# Altium PCB ledcube_v2.PcbDoc (part 9 of 18)
Units mil, origin at the board's own origin, x right, y up, seen from the top; angles counter-clockwise.
Board outline 3130 x 3300 mil, 2 copper layers (Top Layer, Bottom Layer); 188 components, 216 nets, 29515 pads, 250 vias.
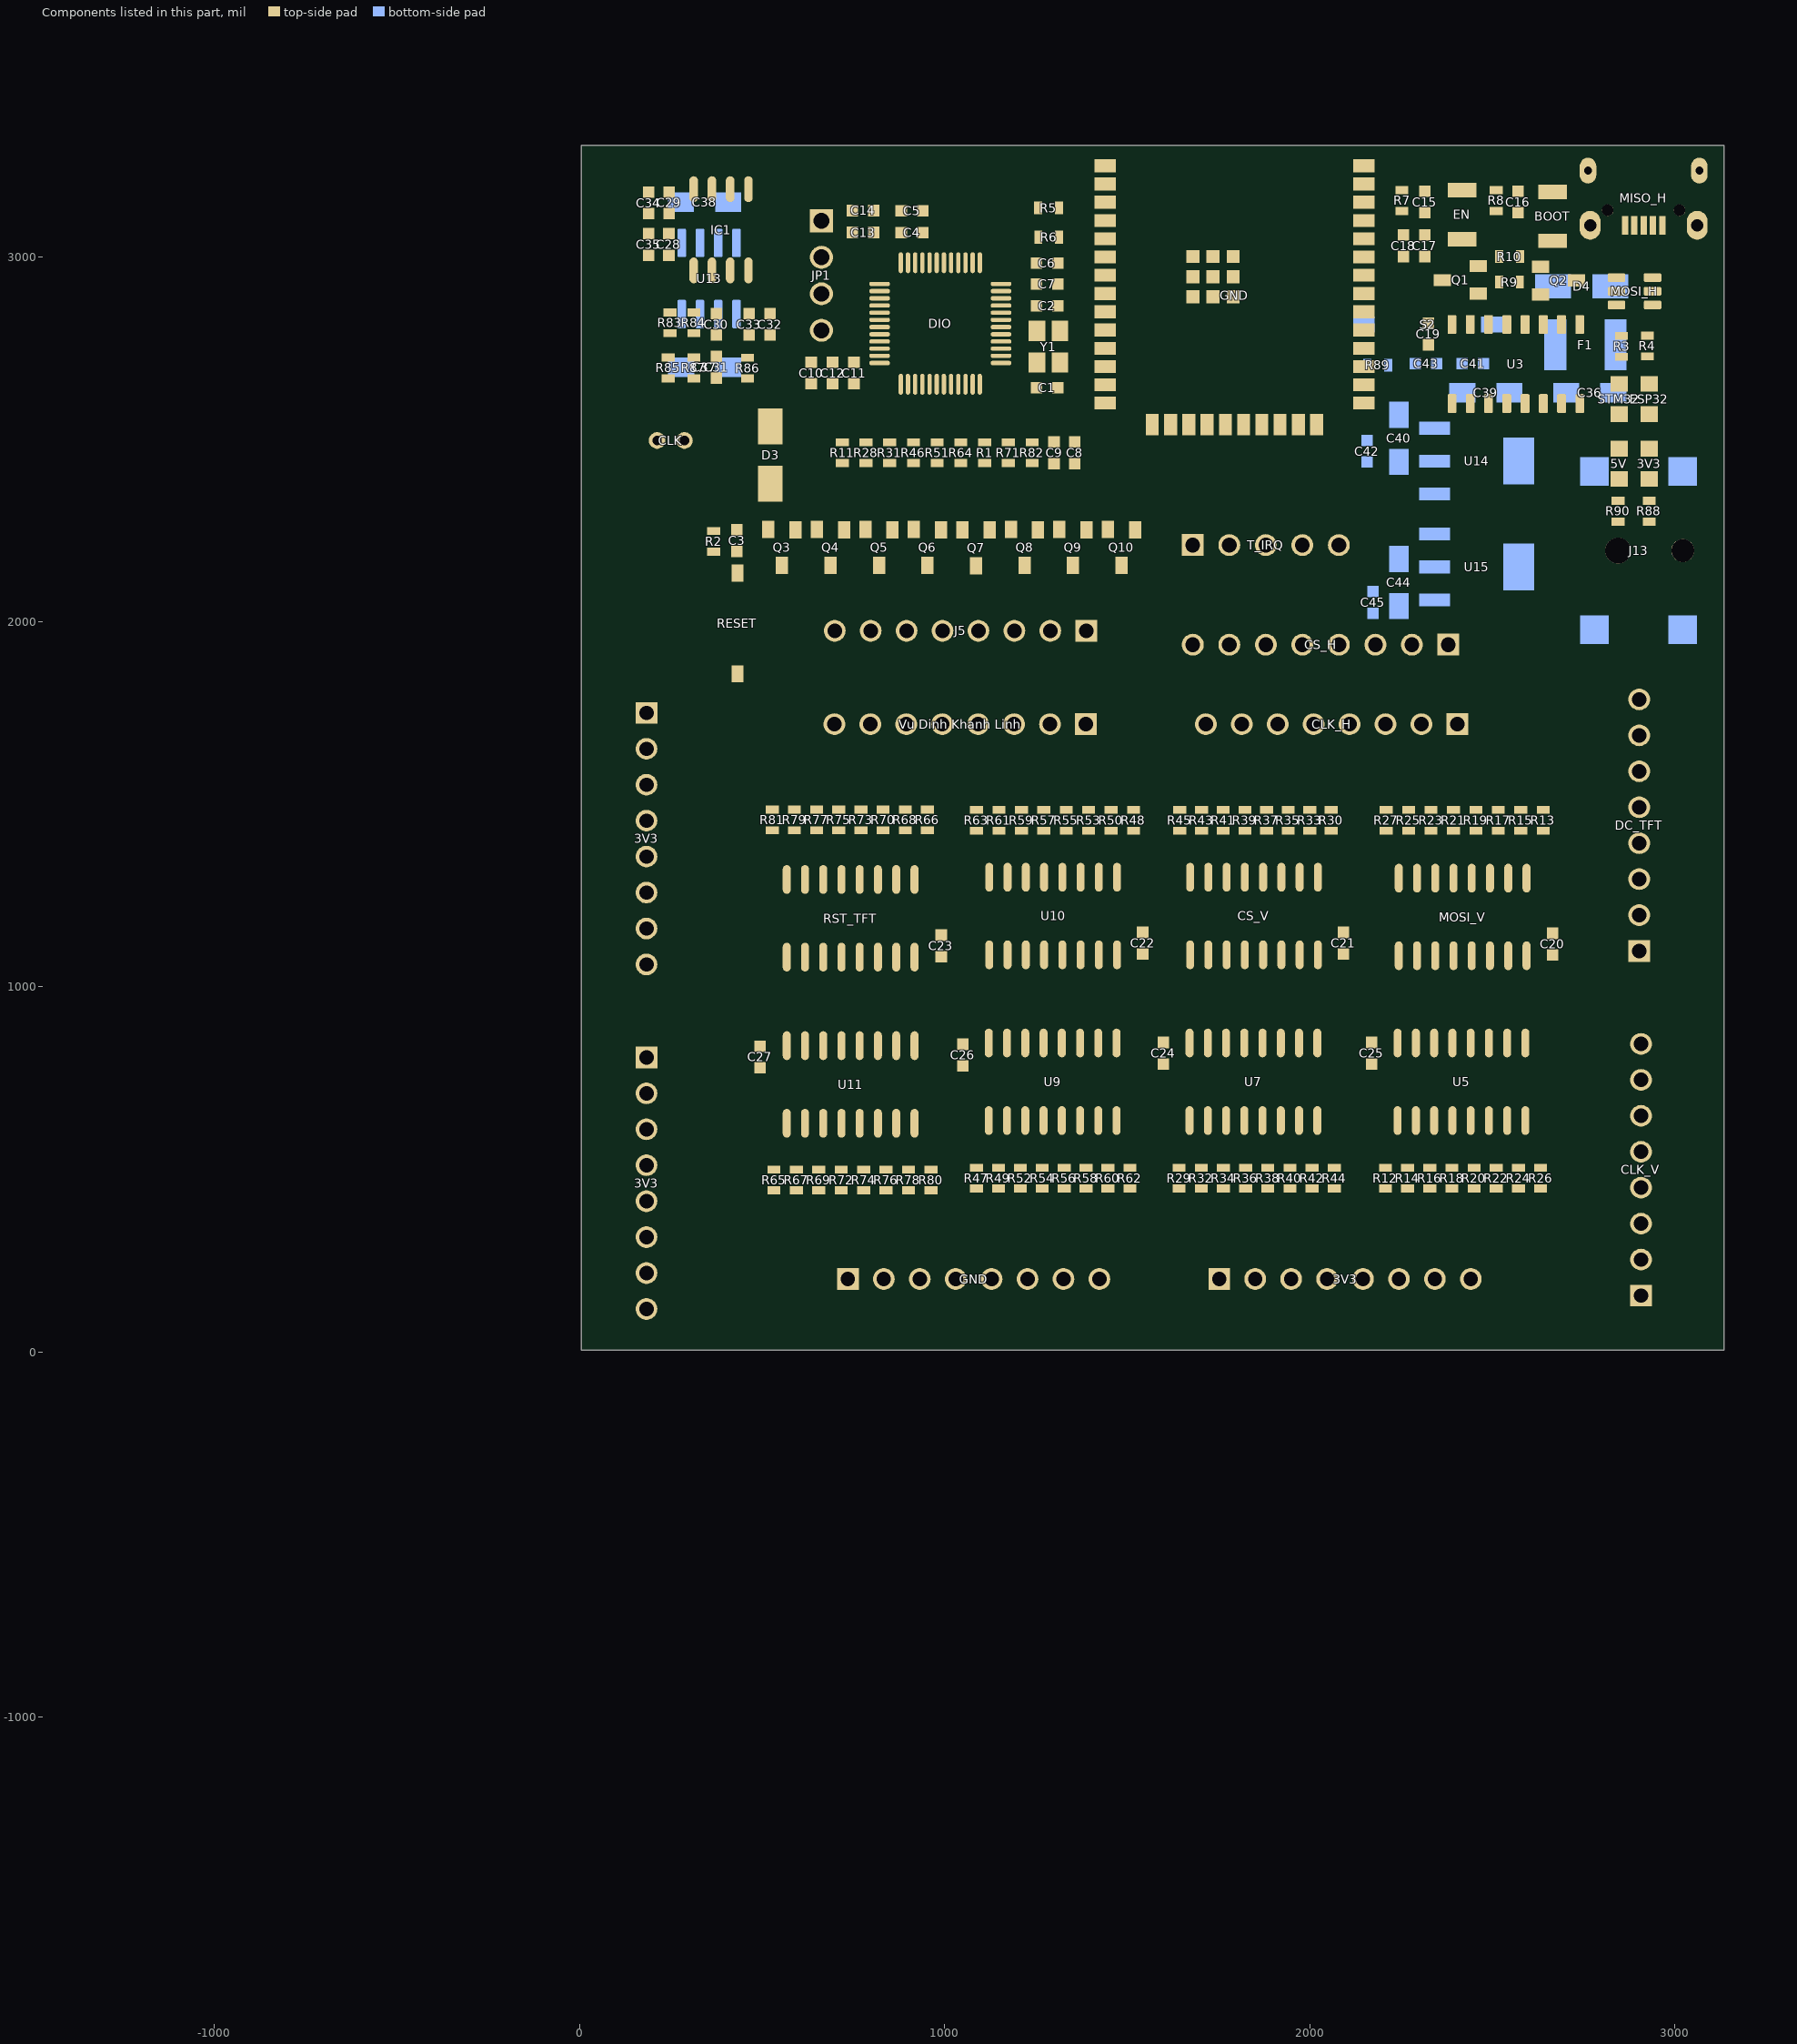
[diagram p8: the components of this part, seen from the top]

## Free pads (board coordinates) (continued)
  round 0 on Mech16: 1(-1372.43,-1737) 1(-1372.43,-1736.94) 1(-1372.43,-1736.94) 1(-1372.43,-1737.21) 1(-1372.43,-1737.21) 1(-1372.43,-1737) 1(-1372.43,-1737) 1(-1372.42,-1737.07) 1(-1372.42,-1737.07) 1(-1372.42,-1737.06) 1(-1372.42,-1737.06) 1(-1372.42,-1737.03) 1(-1372.42,-1737.03) 1(-1372.42,-1737.26) 1(-1372.42,-1737.26) 1(-1372.42,-1737.08) 1(-1372.42,-1737.08) 1(-1372.42,-1737.03) 1(-1372.42,-1737.03) 1(-1372.42,-1737.07) 1(-1372.42,-1737.07) 1(-1372.42,-1737.02) 1(-1372.42,-1737.02) 1(-1372.42,-1737.22) 1(-1372.42,-1737.22) 1(-1372.42,-1737.05) 1(-1372.42,-1737.05) 1(-1372.42,-1737.04) 1(-1372.42,-1737.04) 1(-1372.42,-1737.08) 1(-1372.42,-1737.08) 1(-1372.42,-1737.22) 1(-1372.42,-1737.22) 1(-1372.42,-1737) 1(-1372.42,-1737) 1(-1372.42,-1737.05) 1(-1372.42,-1737.05) 1(-1372.42,-1737.26) 1(-1372.42,-1737.26) 1(-1372.42,-1737.09) 1(-1372.42,-1737.09) 1(-1372.42,-1737.09) 1(-1372.42,-1737.09) 1(-1372.42,-1737.05) 1(-1372.42,-1737.05) 1(-1372.42,-1737.04) 1(-1372.42,-1737.04) 1(-1372.42,-1737.22) 1(-1372.42,-1737.22) 1(-1372.42,-1737.09) 1(-1372.42,-1737.09) 1(-1372.42,-1737.07) 1(-1372.42,-1737.07) 1(-1372.42,-1737.03) 1(-1372.42,-1737.03) 1(-1372.42,-1737.31) 1(-1372.42,-1737.31) 1(-1372.42,-1737.02) 1(-1372.42,-1737.02) 1(-1372.42,-1737) 1(-1372.42,-1737) 1(-1372.42,-1737.04) 1(-1372.42,-1737.04) 1(-1372.42,-1737.02) 1(-1372.42,-1737.02) 1(-1372.42,-1736.99) 1(-1372.42,-1736.99) 1(-1372.42,-1737.07) 1(-1372.42,-1737.07) 1(-1372.42,-1737.21) 1(-1372.42,-1737.21) 1(-1372.42,-1737.01) 1(-1372.42,-1737.01) 1(-1372.42,-1737.07) 1(-1372.42,-1737.07) 1(-1372.42,-1737) 1(-1372.42,-1737) 1(-1372.42,-1737.22) 1(-1372.42,-1737.22) 1(-1372.42,-1737.02) 1(-1372.42,-1737.02) 1(-1372.42,-1737.31) 1(-1372.42,-1737.31) 1(-1372.42,-1737.09) 1(-1372.42,-1737.09) 1(-1372.42,-1737) 1(-1372.42,-1737) 1(-1372.42,-1736.99) 1(-1372.42,-1736.99) 1(-1372.42,-1737.02) 1(-1372.42,-1737.02) 1(-1372.42,-1737) 1(-1372.42,-1737) 1(-1372.42,-1737.05) 1(-1372.42,-1737.05) 1(-1372.42,-1737.05) 1(-1372.42,-1737.05) 1(-1372.42,-1737.09) 1(-1372.42,-1737.09) 1(-1372.42,-1737.05) 1(-1372.42,-1737.05) 1(-1372.42,-1737.03) 1(-1372.42,-1737.03) 1(-1372.41,-1736.99) 1(-1372.41,-1736.99) 1(-1372.41,-1737.22) 1(-1372.41,-1737.22) 1(-1372.41,-1736.97) 1(-1372.41,-1736.97) 1(-1372.41,-1736.95) 1(-1372.41,-1736.95) 1(-1372.41,-1737.06) 1(-1372.41,-1737.06) 1(-1372.41,-1737.06) 1(-1372.41,-1737.06) 1(-1372.41,-1736.95) 1(-1372.41,-1736.95) 1(-1372.41,-1737.22) 1(-1372.41,-1737.22) 1(-1372.41,-1737.21) 1(-1372.41,-1737.21) 1(-1372.41,-1736.94) 1(-1372.41,-1736.94) 1(-1372.41,-1737.09) 1(-1372.41,-1737.09) 1(-1372.41,-1737.06) 1(-1372.41,-1737.06) 1(-1372.41,-1737.06) 1(-1372.41,-1737.06) 1(-1372.41,-1736.93) 1(-1372.41,-1736.93) 1(-1372.41,-1736.9) 1(-1372.41,-1736.9) 1(-1372.41,-1737.22) 1(-1372.41,-1737.22) 1(-1372.41,-1736.9) 1(-1372.41,-1736.9) 1(-1372.41,-1737.22) 1(-1372.41,-1737.22) 1(-1372.41,-1737) 1(-1372.41,-1737) 1(-1372.41,-1736.97) 1(-1372.41,-1736.97) 1(-1372.41,-1736.91) 1(-1372.41,-1736.91) 1(-1372.41,-1737.03) 1(-1372.41,-1737.03) 1(-1372.41,-1737.26) 1(-1372.41,-1737.26) 1(-1372.41,-1737.21) 1(-1372.41,-1737.21) 1(-1372.41,-1737.22) 1(-1372.41,-1737.22) 1(-1372.41,-1737.05) 1(-1372.41,-1737.05) 1(-1372.41,-1736.94) 1(-1372.41,-1736.94) 1(-1372.41,-1737.05) 1(-1372.41,-1737.05) 1(-1372.41,-1736.93) 1(-1372.41,-1736.93) 1(-1372.41,-1737.05) 1(-1372.41,-1737.05) 1(-1372.41,-1736.95) 1(-1372.41,-1736.95) 1(-1372.41,-1737.09) 1(-1372.41,-1737.09) 1(-1372.41,-1736.94) 1(-1372.41,-1736.94) 1(-1372.41,-1736.94) 1(-1372.41,-1736.94) 1(-1372.41,-1736.91) 1(-1372.41,-1736.91) 1(-1372.41,-1736.89) 1(-1372.41,-1736.89) 1(-1372.41,-1737.05) 1(-1372.41,-1737.05) 1(-1372.41,-1737.06) 1(-1372.41,-1737.06) 1(-1372.41,-1736.95) 1(-1372.41,-1736.95) 1(-1372.41,-1737.09) 1(-1372.41,-1737.09) 1(-1372.41,-1737.04) 1(-1372.41,-1737.04) 1(-1372.41,-1737.21) 1(-1372.41,-1737.21) 1(-1372.41,-1737.05) 1(-1372.41,-1737.05) 1(-1372.41,-1737.04) 1(-1372.41,-1737.04) 1(-1372.41,-1736.95) 1(-1372.41,-1736.95) 1(-1372.41,-1736.93) 1(-1372.41,-1736.93) 1(-1372.41,-1737.21) 1(-1372.41,-1737.21) 1(-1372.41,-1737.09) 1(-1372.41,-1737.09) 1(-1372.41,-1736.95) 1(-1372.41,-1736.95) 1(-1372.41,-1737.22) 1(-1372.41,-1737.22) 1(-1372.41,-1737.04) 1(-1372.41,-1737.04) 1(-1372.41,-1736.93) 1(-1372.41,-1736.93) 1(-1372.41,-1737.06) 1(-1372.41,-1737.06) 1(-1372.41,-1737.22) 1(-1372.41,-1737.22) 1(-1372.41,-1737.21) 1(-1372.41,-1737.21) 1(-1372.41,-1737.05) 1(-1372.41,-1737.05) 1(-1372.41,-1736.94) 1(-1372.41,-1736.94) 1(-1372.41,-1736.94) 1(-1372.41,-1736.94) 1(-1372.41,-1736.9) 1(-1372.41,-1736.9) 1(-1372.41,-1737.06) 1(-1372.41,-1737.06) 1(-1372.41,-1736.91) 1(-1372.41,-1736.91) 1(-1372.4,-1737.09) 1(-1372.4,-1737.09) 1(-1372.4,-1737.04) 1(-1372.4,-1737.04) 1(-1372.4,-1736.94) 1(-1372.4,-1736.94) 1(-1372.4,-1737.04) 1(-1372.4,-1737.04) 1(-1372.4,-1737.09) 1(-1372.4,-1737.09) 1(-1372.4,-1737.04) 1(-1372.4,-1737.04) 1(-1372.4,-1736.94) 1(-1372.4,-1736.94) 1(-1372.4,-1737.21) 1(-1372.4,-1737.21) 1(-1372.4,-1737.1) 1(-1372.4,-1737.1) 1(-1372.4,-1737.11) 1(-1372.4,-1737.11) 1(-1372.4,-1737.1) 1(-1372.4,-1737.1) 1(-1372.4,-1736.94) 1(-1372.4,-1736.94) 1(-1372.4,-1736.94) 1(-1372.4,-1736.94) 1(-1372.4,-1737.04) 1(-1372.4,-1737.04) 1(-1372.4,-1737.04) 1(-1372.4,-1737.04) 1(-1372.4,-1737.09) 1(-1372.4,-1737.09) 1(-1372.4,-1736.89) 1(-1372.4,-1736.89) 1(-1372.4,-1736.94) 1(-1372.4,-1736.94) 1(-1372.4,-1737.1) 1(-1372.4,-1737.1) 1(-1372.4,-1737.1) 1(-1372.4,-1737.1) 1(-1372.4,-1737.2) 1(-1372.4,-1737.2) 1(-1372.4,-1737.11) 1(-1372.4,-1737.11) 1(-1372.4,-1737.04) 1(-1372.4,-1737.04) 1(-1372.4,-1737.23) 1(-1372.4,-1737.23) 1(-1372.4,-1737.04) 1(-1372.4,-1737.04) 1(-1372.4,-1737.11) 1(-1372.4,-1737.11) 1(-1372.4,-1737.23) 1(-1372.4,-1737.23) 1(-1372.4,-1737.04) 1(-1372.4,-1737.04) 1(-1372.4,-1736.91) 1(-1372.4,-1736.91) 1(-1372.4,-1737.26) 1(-1372.4,-1737.26) 1(-1372.4,-1736.9) 1(-1372.4,-1736.9) 1(-1372.4,-1737.2) 1(-1372.4,-1737.2) 1(-1372.4,-1737.03) 1(-1372.4,-1737.03) 1(-1372.4,-1737.11) 1(-1372.4,-1737.11) 1(-1372.4,-1737.03) 1(-1372.4,-1737.03) 1(-1372.4,-1737.21) 1(-1372.4,-1737.21) 1(-1372.4,-1736.94) 1(-1372.4,-1736.94) 1(-1372.39,-1737.11) 1(-1372.39,-1737.11) 1(-1372.39,-1736.89) 1(-1372.39,-1736.89) 1(-1372.39,-1737.23) 1(-1372.39,-1737.23) 1(-1372.39,-1737.2) 1(-1372.39,-1737.2) 1(-1372.39,-1737.03) 1(-1372.39,-1737.03) 1(-1372.39,-1737.23) 1(-1372.39,-1737.23) 1(-1372.39,-1737.1) 1(-1372.39,-1737.1) 1(-1372.39,-1737.03) 1(-1372.39,-1737.03) 1(-1372.39,-1737.26) 1(-1372.39,-1737.26) 1(-1372.39,-1737.2) 1(-1372.39,-1737.2) 1(-1372.39,-1736.88) 1(-1372.39,-1736.88) 1(-1372.39,-1736.94) 1(-1372.39,-1736.94) 1(-1372.39,-1737.2) 1(-1372.39,-1737.2) 1(-1372.39,-1737.23) 1(-1372.39,-1737.23) 1(-1372.39,-1736.88) 1(-1372.39,-1736.88) 1(-1372.39,-1737.17) 1(-1372.39,-1737.17) 1(-1372.39,-1737.23) 1(-1372.39,-1737.23) 1(-1372.39,-1737.19) 1(-1372.39,-1737.19) 1(-1372.39,-1737.26) 1(-1372.39,-1737.26) 1(-1372.39,-1736.9) 1(-1372.39,-1736.9) 1(-1372.39,-1737.18) 1(-1372.39,-1737.18) 1(-1372.39,-1737.11) 1(-1372.39,-1737.11) 1(-1372.39,-1737.03) 1(-1372.39,-1737.03) 1(-1372.39,-1737.23) 1(-1372.39,-1737.23) 1(-1372.39,-1737.2) 1(-1372.39,-1737.2) 1(-1372.39,-1737.31) 1(-1372.39,-1737.31) 1(-1372.39,-1736.88) 1(-1372.39,-1736.88) 1(-1372.39,-1737.26) 1(-1372.39,-1737.26) 1(-1372.39,-1737.1) 1(-1372.39,-1737.1) 1(-1372.39,-1736.89) 1(-1372.39,-1736.89) 1(-1372.39,-1737.03) 1(-1372.39,-1737.03) 1(-1372.39,-1736.88) 1(-1372.39,-1736.88) 1(-1372.38,-1737.18) 1(-1372.38,-1737.18) 1(-1372.38,-1736.88) 1(-1372.38,-1736.88) 1(-1372.38,-1736.88) 1(-1372.38,-1736.88) 1(-1372.38,-1737.04) 1(-1372.38,-1737.04) 1(-1372.38,-1736.89) 1(-1372.38,-1736.89) 1(-1372.38,-1737.19) 1(-1372.38,-1737.19) 1(-1372.38,-1737.18) 1(-1372.38,-1737.18) 1(-1372.38,-1737.18) 1(-1372.38,-1737.18) 1(-1372.38,-1736.9) 1(-1372.38,-1736.9) 1(-1372.38,-1736.89) 1(-1372.38,-1736.89) 1(-1372.38,-1737.24) 1(-1372.38,-1737.24) 1(-1372.38,-1736.88) 1(-1372.38,-1736.88) 1(-1372.38,-1737.26) 1(-1372.38,-1737.26) 1(-1372.38,-1737.18) 1(-1372.38,-1737.18) 1(-1372.38,-1737.04) 1(-1372.38,-1737.04) 1(-1372.38,-1736.88) 1(-1372.38,-1736.88) 1(-1372.38,-1736.88) 1(-1372.38,-1736.88) 1(-1372.38,-1737.24) 1(-1372.38,-1737.24) 1(-1372.38,-1737.17) 1(-1372.38,-1737.17) 1(-1372.38,-1737.03) 1(-1372.38,-1737.03) 1(-1372.38,-1736.94) 1(-1372.38,-1736.94) 1(-1372.38,-1737.22) 1(-1372.38,-1737.22) 1(-1372.38,-1737.03) 1(-1372.38,-1737.03) 1(-1372.38,-1737.1) 1(-1372.38,-1737.1) 1(-1372.38,-1736.89) 1(-1372.38,-1736.89) 1(-1372.38,-1737.03) 1(-1372.38,-1737.03) 1(-1372.38,-1736.88) 1(-1372.38,-1736.88) 1(-1372.38,-1736.9) 1(-1372.38,-1736.9) 1(-1372.38,-1737.04) 1(-1372.38,-1737.04) 1(-1372.38,-1737.03) 1(-1372.38,-1737.03) 1(-1372.38,-1736.89) 1(-1372.38,-1736.89) 1(-1372.38,-1737.02) 1(-1372.38,-1737.02) 1(-1372.38,-1737.18) 1(-1372.38,-1737.18) 1(-1372.38,-1736.94) 1(-1372.38,-1736.94) 1(-1372.38,-1736.93) 1(-1372.38,-1736.93) 1(-1372.38,-1736.92) 1(-1372.38,-1736.92) 1(-1372.38,-1736.99) 1(-1372.38,-1736.99) 1(-1372.38,-1736.99) 1(-1372.38,-1736.99) 1(-1372.38,-1736.92) 1(-1372.38,-1736.92) 1(-1372.38,-1737.01) 1(-1372.38,-1737.01) 1(-1372.38,-1736.99) 1(-1372.38,-1736.99) 1(-1372.38,-1736.96) 1(-1372.38,-1736.96) 1(-1372.38,-1737.29) 1(-1372.38,-1737.29) 1(-1372.38,-1736.98) 1(-1372.38,-1736.98) 1(-1372.38,-1736.89) 1(-1372.38,-1736.89) 1(-1372.38,-1737.04) 1(-1372.38,-1737.04) 1(-1372.38,-1736.99) 1(-1372.38,-1736.99) 1(-1372.38,-1736.95) 1(-1372.38,-1736.95) 1(-1372.38,-1737) 1(-1372.38,-1737) 1(-1372.38,-1736.94) 1(-1372.38,-1736.94) 1(-1372.38,-1736.92) 1(-1372.38,-1736.92) 1(-1372.38,-1737.01) 1(-1372.38,-1737.01) 1(-1372.38,-1736.99) 1(-1372.38,-1736.99) 1(-1372.38,-1737.26) 1(-1372.38,-1737.26) 1(-1372.38,-1736.98) 1(-1372.38,-1736.98) 1(-1372.38,-1736.96) 1(-1372.38,-1736.96) 1(-1372.38,-1737.11) 1(-1372.38,-1737.11) 1(-1372.38,-1737.02) 1(-1372.38,-1737.02) 1(-1372.38,-1737.02) 1(-1372.38,-1737.02) 1(-1372.38,-1737.02) 1(-1372.38,-1737.02) 1(-1372.38,-1736.99) 1(-1372.38,-1736.99) 1(-1372.38,-1737.11) 1(-1372.38,-1737.11) 1(-1372.38,-1737.04) 1(-1372.38,-1737.04) 1(-1372.38,-1737.03) 1(-1372.38,-1737.03) 1(-1372.38,-1737.03) 1(-1372.38,-1737.03) 1(-1372.38,-1736.95) 1(-1372.38,-1736.95) 1(-1372.38,-1736.92) 1(-1372.38,-1736.92) 1(-1372.38,-1736.98) 1(-1372.38,-1736.98) 1(-1372.38,-1736.94) 1(-1372.38,-1736.94) 1(-1372.38,-1737.04) 1(-1372.38,-1737.04) 1(-1372.38,-1737.03) 1(-1372.38,-1737.03) 1(-1372.38,-1736.95) 1(-1372.38,-1736.95) 1(-1372.38,-1736.97) 1(-1372.38,-1736.97) 1(-1372.38,-1736.89) 1(-1372.38,-1736.89) 1(-1372.38,-1736.96) 1(-1372.38,-1736.96) 1(-1372.38,-1737.17) 1(-1372.38,-1737.17) 1(-1372.38,-1736.99) 1(-1372.38,-1736.99) 1(-1372.38,-1737.04) 1(-1372.38,-1737.04) 1(-1372.38,-1737.02) 1(-1372.38,-1737.02) 1(-1372.38,-1736.96) 1(-1372.38,-1736.96) 1(-1372.38,-1737.11) 1(-1372.38,-1737.11) 1(-1372.38,-1736.99) 1(-1372.38,-1736.99) 1(-1372.38,-1736.96) 1(-1372.38,-1736.96) 1(-1372.38,-1737.02) 1(-1372.38,-1737.02) 1(-1372.38,-1736.99) 1(-1372.38,-1736.99) 1(-1372.38,-1736.88) 1(-1372.38,-1736.88) 1(-1372.37,-1737.03) 1(-1372.37,-1737.03) 1(-1372.37,-1737.02) 1(-1372.37,-1737.02) 1(-1372.37,-1737.11) 1(-1372.37,-1737.11) 1(-1372.37,-1737.04) 1(-1372.37,-1737.04) 1(-1372.37,-1736.89) 1(-1372.37,-1736.89) 1(-1372.37,-1737.12) 1(-1372.37,-1737.12) 1(-1372.37,-1736.94) 1(-1372.37,-1736.94) 1(-1372.37,-1737.17) 1(-1372.37,-1737.17) 1(-1372.37,-1736.96) 1(-1372.37,-1736.96) 1(-1372.37,-1736.98) 1(-1372.37,-1736.98) 1(-1372.37,-1736.92) 1(-1372.37,-1736.92) 1(-1372.37,-1736.89) 1(-1372.37,-1736.89) 1(-1372.37,-1736.95) 1(-1372.37,-1736.95) 1(-1372.37,-1737.11) 1(-1372.37,-1737.11) 1(-1372.37,-1737.13) 1(-1372.37,-1737.13) 1(-1372.37,-1736.92) 1(-1372.37,-1736.92) 1(-1372.37,-1737.04) 1(-1372.37,-1737.04) 1(-1372.37,-1736.98) 1(-1372.37,-1736.98) 1(-1372.37,-1737.24) 1(-1372.37,-1737.24) 1(-1372.37,-1736.98) 1(-1372.37,-1736.98) 1(-1372.37,-1736.89) 1(-1372.37,-1736.89) 1(-1372.37,-1736.94) 1(-1372.37,-1736.94) 1(-1372.37,-1736.93) 1(-1372.37,-1736.93) 1(-1372.37,-1736.92) 1(-1372.37,-1736.92) 1(-1372.37,-1737.03) 1(-1372.37,-1737.03) 1(-1372.37,-1736.95) 1(-1372.37,-1736.95) 1(-1372.37,-1737.22) 1(-1372.37,-1737.22) 1(-1372.37,-1736.95) 1(-1372.37,-1736.95) 1(-1372.37,-1737.26) 1(-1372.37,-1737.26) 1(-1372.37,-1737.06) 1(-1372.37,-1737.06) 1(-1372.37,-1736.88) 1(-1372.37,-1736.88) 1(-1372.37,-1737.03) 1(-1372.37,-1737.03) 1(-1372.37,-1737.13) 1(-1372.37,-1737.13) 1(-1372.37,-1736.93) 1(-1372.37,-1736.93) 1(-1372.37,-1736.92) 1(-1372.37,-1736.92) 1(-1372.37,-1737.04) 1(-1372.37,-1737.04) 1(-1372.37,-1736.98) 1(-1372.37,-1736.98) 1(-1372.37,-1736.94) 1(-1372.37,-1736.94) 1(-1372.37,-1737.22) 1(-1372.37,-1737.22) 1(-1372.37,-1737.24) 1(-1372.37,-1737.24) 1(-1372.37,-1736.93) 1(-1372.37,-1736.93) 1(-1372.37,-1736.92) 1(-1372.37,-1736.92) 1(-1372.37,-1736.89) 1(-1372.37,-1736.89) 1(-1372.37,-1736.88) 1(-1372.37,-1736.88) 1(-1372.37,-1737.24) 1(-1372.37,-1737.24) 1(-1372.37,-1737.11) 1(-1372.37,-1737.11) 1(-1372.37,-1736.99) 1(-1372.37,-1736.99) 1(-1372.37,-1736.93) 1(-1372.37,-1736.93) 1(-1372.37,-1736.92) 1(-1372.37,-1736.92) 1(-1372.37,-1737.23) 1(-1372.37,-1737.23) 1(-1372.37,-1736.87) 1(-1372.37,-1736.87) 1(-1372.37,-1737.17) 1(-1372.37,-1737.17) 1(-1372.37,-1737.26) 1(-1372.37,-1737.26) 1(-1372.37,-1737.22) 1(-1372.37,-1737.22) 1(-1372.37,-1737.12) 1(-1372.37,-1737.12) 1(-1372.37,-1737.12) 1(-1372.37,-1737.12) 1(-1372.37,-1736.93) 1(-1372.37,-1736.93) 1(-1372.37,-1736.92) 1(-1372.37,-1736.92) 1(-1372.37,-1737.13) 1(-1372.37,-1737.13) 1(-1372.37,-1737.11) 1(-1372.37,-1737.11) 1(-1372.37,-1736.89) 1(-1372.37,-1736.89) 1(-1372.37,-1737.23) 1(-1372.37,-1737.23) 1(-1372.37,-1737.02) 1(-1372.37,-1737.02) 1(-1372.37,-1737.23) 1(-1372.37,-1737.23) 1(-1372.37,-1736.95) 1(-1372.37,-1736.95) 1(-1372.37,-1737.05) 1(-1372.37,-1737.05) 1(-1372.37,-1736.95) 1(-1372.37,-1736.95) 1(-1372.37,-1736.92) 1(-1372.37,-1736.92) 1(-1372.37,-1736.89) 1(-1372.37,-1736.89) 1(-1372.37,-1736.96) 1(-1372.37,-1736.96) 1(-1372.37,-1737.17) 1(-1372.37,-1737.17) 1(-1372.37,-1737.04) 1(-1372.37,-1737.04) 1(-1372.37,-1737.04) 1(-1372.37,-1737.04) 1(-1372.37,-1737.04) 1(-1372.37,-1737.04) 1(-1372.37,-1736.98) 1(-1372.37,-1736.98) 1(-1372.37,-1736.94) 1(-1372.37,-1736.94) 1(-1372.37,-1736.93) 1(-1372.37,-1736.93) 1(-1372.37,-1737.15) 1(-1372.37,-1737.15) 1(-1372.37,-1737.14) 1(-1372.37,-1737.14) 1(-1372.37,-1737.05) 1(-1372.37,-1737.05) 1(-1372.37,-1736.95) 1(-1372.37,-1736.95) 1(-1372.37,-1736.92) 1(-1372.37,-1736.92) 1(-1372.37,-1736.87) 1(-1372.37,-1736.87) 1(-1372.37,-1737.03) 1(-1372.37,-1737.03) 1(-1372.37,-1737.02) 1(-1372.37,-1737.02) 1(-1372.37,-1737.23) 1(-1372.37,-1737.23) 1(-1372.37,-1737.13) 1(-1372.37,-1737.13) 1(-1372.37,-1736.94) 1(-1372.37,-1736.94) 1(-1372.37,-1737.26) 1(-1372.37,-1737.26) 1(-1372.37,-1737.04) 1(-1372.37,-1737.04) 1(-1372.37,-1737.01) 1(-1372.37,-1737.01) 1(-1372.37,-1737) 1(-1372.37,-1737) 1(-1372.37,-1736.92) 1(-1372.37,-1736.92) 1(-1372.37,-1736.89) 1(-1372.37,-1736.89) 1(-1372.37,-1737) 1(-1372.37,-1737) 1(-1372.37,-1736.95) 1(-1372.37,-1736.95) 1(-1372.37,-1737) 1(-1372.37,-1737) 1(-1372.37,-1737.01) 1(-1372.37,-1737.01) 1(-1372.37,-1736.89) 1(-1372.37,-1736.89) 1(-1372.37,-1737.16) 1(-1372.37,-1737.16) 1(-1372.37,-1737.15) 1(-1372.37,-1737.15) 1(-1372.37,-1737.06) 1(-1372.37,-1737.06) 1(-1372.37,-1737.15) 1(-1372.37,-1737.15) 1(-1372.37,-1737.14) 1(-1372.37,-1737.14) 1(-1372.37,-1737.13) 1(-1372.37,-1737.13) 1(-1372.37,-1737.13) 1(-1372.37,-1737.13) 1(-1372.37,-1737.03) 1(-1372.37,-1737.03) 1(-1372.37,-1736.98) 1(-1372.37,-1736.98) 1(-1372.37,-1736.88) 1(-1372.37,-1736.88) 1(-1372.37,-1737.04) 1(-1372.37,-1737.04) 1(-1372.37,-1737.14) 1(-1372.37,-1737.14) 1(-1372.37,-1736.96) 1(-1372.37,-1736.96) 1(-1372.37,-1737.05) 1(-1372.37,-1737.05) 1(-1372.37,-1737.05) 1(-1372.37,-1737.05) 1(-1372.37,-1737) 1(-1372.37,-1737) 1(-1372.37,-1737.16) 1(-1372.37,-1737.16) 1(-1372.37,-1737.13) 1(-1372.37,-1737.13) 1(-1372.37,-1736.97) 1(-1372.37,-1736.97) 1(-1372.37,-1736.96) 1(-1372.37,-1736.96) 1(-1372.37,-1736.89) 1(-1372.37,-1736.89) 1(-1372.37,-1736.88) 1(-1372.37,-1736.88) 1(-1372.37,-1736.99) 1(-1372.37,-1736.99) 1(-1372.37,-1737.05) 1(-1372.37,-1737.05) 1(-1372.37,-1736.87) 1(-1372.37,-1736.87) 1(-1372.37,-1737.17) 1(-1372.37,-1737.17) 1(-1372.37,-1737.05) 1(-1372.37,-1737.05) 1(-1372.37,-1736.93) 1(-1372.37,-1736.93) 1(-1372.37,-1736.98) 1(-1372.37,-1736.98) 1(-1372.37,-1736.97) 1(-1372.37,-1736.97) 1(-1372.37,-1737.01) 1(-1372.37,-1737.01) 1(-1372.37,-1736.97) 1(-1372.37,-1736.97) 1(-1372.37,-1736.95) 1(-1372.37,-1736.95) 1(-1372.37,-1736.88) 1(-1372.37,-1736.88) 1(-1372.37,-1737.15) 1(-1372.37,-1737.15) 1(-1372.37,-1737.14) 1(-1372.37,-1737.14) 1(-1372.36,-1737.27) 1(-1372.36,-1737.27) 1(-1372.36,-1737) 1(-1372.36,-1737) 1(-1372.36,-1736.99) 1(-1372.36,-1736.99) 1(-1372.36,-1736.97) 1(-1372.36,-1736.97) 1(-1372.36,-1736.88) 1(-1372.36,-1736.88) 1(-1372.36,-1737.28) 1(-1372.36,-1737.28) 1(-1372.36,-1736.87) 1(-1372.36,-1736.87) 1(-1372.36,-1737.05) 1(-1372.36,-1737.05) 1(-1372.36,-1736.94) 1(-1372.36,-1736.94) 1(-1372.36,-1736.99) 1(-1372.36,-1736.99) 1(-1372.36,-1737.27) 1(-1372.36,-1737.27) 1(-1372.36,-1736.98) 1(-1372.36,-1736.98) 1(-1372.36,-1737.26) 1(-1372.36,-1737.26) 1(-1372.36,-1737.13) 1(-1372.36,-1737.13) 1(-1372.36,-1736.97) 1(-1372.36,-1736.97) 1(-1372.36,-1736.96) 1(-1372.36,-1736.96) 1(-1372.36,-1736.94) 1(-1372.36,-1736.94) 1(-1372.36,-1736.9) 1(-1372.36,-1736.9) 1(-1372.36,-1737.28) 1(-1372.36,-1737.28) 1(-1372.36,-1737.23) 1(-1372.36,-1737.23) 1(-1372.36,-1736.93) 1(-1372.36,-1736.93) 1(-1372.36,-1737.16) 1(-1372.36,-1737.16) 1(-1372.36,-1737.16) 1(-1372.36,-1737.16) 1(-1372.36,-1737.03) 1(-1372.36,-1737.03) 1(-1372.36,-1736.94) 1(-1372.36,-1736.94) 1(-1372.36,-1736.87) 1(-1372.36,-1736.87) 1(-1372.36,-1736.97) 1(-1372.36,-1736.97) 1(-1372.36,-1736.88) 1(-1372.36,-1736.88) 1(-1372.36,-1737.14) 1(-1372.36,-1737.14) 1(-1372.36,-1737.06) 1(-1372.36,-1737.06) 1(-1372.36,-1736.88) 1(-1372.36,-1736.88) 1(-1372.36,-1737.13) 1(-1372.36,-1737.13) 1(-1372.36,-1737) 1(-1372.36,-1737) 1(-1372.36,-1736.97) 1(-1372.36,-1736.97) 1(-1372.36,-1736.87) 1(-1372.36,-1736.87) 1(-1372.36,-1736.89) 1(-1372.36,-1736.89) 1(-1372.36,-1737.28) 1(-1372.36,-1737.28) 1(-1372.36,-1737.04) 1(-1372.36,-1737.04) 1(-1372.36,-1736.87) 1(-1372.36,-1736.87) 1(-1372.36,-1737.05) 1(-1372.36,-1737.05) 1(-1372.36,-1736.88) 1(-1372.36,-1736.88) 1(-1372.36,-1736.87) 1(-1372.36,-1736.87) 1(-1372.36,-1737.06) 1(-1372.36,-1737.06) 1(-1372.36,-1737.03) 1(-1372.36,-1737.03) 1(-1372.36,-1737.02) 1(-1372.36,-1737.02) 1(-1372.36,-1737) 1(-1372.36,-1737) 1(-1372.36,-1736.88) 1(-1372.36,-1736.88) 1(-1372.36,-1736.87) 1(-1372.36,-1736.87) 1(-1372.36,-1736.88) 1(-1372.36,-1736.88) 1(-1372.36,-1736.99) 1(-1372.36,-1736.99) 1(-1372.36,-1736.88) 1(-1372.36,-1736.88) 1(-1372.36,-1737.26) 1(-1372.36,-1737.26) 1(-1372.36,-1736.88) 1(-1372.36,-1736.88) 1(-1372.36,-1736.95) 1(-1372.36,-1736.95) 1(-1372.36,-1737.31) 1(-1372.36,-1737.31) 1(-1372.36,-1736.88) 1(-1372.36,-1736.88) 1(-1372.36,-1737.27) 1(-1372.36,-1737.27) 1(-1372.36,-1736.99) 1(-1372.36,-1736.99) 1(-1372.36,-1737.05) 1(-1372.36,-1737.05) 1(-1372.36,-1737.06) 1(-1372.36,-1737.06) 1(-1372.35,-1736.88) 1(-1372.35,-1736.88) 1(-1372.35,-1736.87) 1(-1372.35,-1736.87) 1(-1372.35,-1736.88) 1(-1372.35,-1736.88) 1(-1372.35,-1736.88) 1(-1372.35,-1736.88) 1(-1372.35,-1737.07) 1(-1372.35,-1737.07) 1(-1372.35,-1736.99) 1(-1372.35,-1736.99) 1(-1372.35,-1736.98) 1(-1372.35,-1736.98) 1(-1372.35,-1737.28) 1(-1372.35,-1737.28) 1(-1372.35,-1737.04) 1(-1372.35,-1737.04) 1(-1372.35,-1737) 1(-1372.35,-1737) 1(-1372.35,-1736.97) 1(-1372.35,-1736.97) 1(-1372.35,-1737.01) 1(-1372.35,-1737.01) 1(-1372.35,-1737.23) 1(-1372.35,-1737.23) 1(-1372.35,-1737.06) 1(-1372.35,-1737.06) 1(-1372.35,-1736.92) 1(-1372.35,-1736.92) 1(-1372.35,-1736.99) 1(-1372.35,-1736.99) 1(-1372.35,-1737.06) 1(-1372.35,-1737.06) 1(-1372.35,-1736.87) 1(-1372.35,-1736.87) 1(-1372.35,-1736.87) 1(-1372.35,-1736.87) 1(-1372.35,-1736.92) 1(-1372.35,-1736.92) 1(-1372.35,-1737.06) 1(-1372.35,-1737.06) 1(-1372.35,-1736.95) 1(-1372.35,-1736.95) 1(-1372.35,-1736.87) 1(-1372.35,-1736.87) 1(-1372.35,-1736.94) 1(-1372.35,-1736.94) 1(-1372.35,-1736.88) 1(-1372.35,-1736.88) 1(-1372.35,-1736.98) 1(-1372.35,-1736.98) 1(-1372.35,-1736.97) 1(-1372.35,-1736.97) 1(-1372.35,-1736.96) 1(-1372.35,-1736.96) 1(-1372.35,-1737.23) 1(-1372.35,-1737.23) 1(-1372.35,-1736.88) 1(-1372.35,-1736.88) 1(-1372.35,-1736.87) 1(-1372.35,-1736.87) 1(-1372.35,-1736.88) 1(-1372.35,-1736.88) 1(-1372.35,-1736.87) 1(-1372.35,-1736.87) 1(-1372.35,-1736.94) 1(-1372.35,-1736.94) 1(-1372.35,-1737.01) 1(-1372.35,-1737.01) 1(-1372.35,-1736.87) 1(-1372.35,-1736.87) 1(-1372.35,-1736.88) 1(-1372.35,-1736.88) 1(-1372.35,-1736.87) 1(-1372.35,-1736.87) 1(-1372.35,-1736.88) 1(-1372.35,-1736.88) 1(-1372.35,-1737.07) 1(-1372.35,-1737.07) 1(-1372.35,-1736.93) 1(-1372.35,-1736.93) 1(-1372.35,-1737.27) 1(-1372.35,-1737.27) 1(-1372.35,-1737.04) 1(-1372.35,-1737.04) 1(-1372.35,-1736.87) 1(-1372.35,-1736.87) 1(-1372.35,-1736.87) 1(-1372.35,-1736.87) 1(-1372.35,-1737) 1(-1372.35,-1737) 1(-1372.35,-1737.28) 1(-1372.35,-1737.28) 1(-1372.35,-1737.06) 1(-1372.35,-1737.06) 1(-1372.35,-1736.98) 1(-1372.35,-1736.98) 1(-1372.35,-1736.88) 1(-1372.35,-1736.88) 1(-1372.35,-1737.05) 1(-1372.35,-1737.05) 1(-1372.35,-1737.06) 1(-1372.35,-1737.06) 1(-1372.35,-1736.87) 1(-1372.35,-1736.87) 1(-1372.35,-1737.04) 1(-1372.35,-1737.04) 1(-1372.35,-1737.03) 1(-1372.35,-1737.03) 1(-1372.35,-1737.02) 1(-1372.35,-1737.02) 1(-1372.35,-1737.05) 1(-1372.35,-1737.05) 1(-1372.35,-1737) 1(-1372.35,-1737) 1(-1372.35,-1736.87) 1(-1372.35,-1736.87) 1(-1372.35,-1737.28) 1(-1372.35,-1737.28) 1(-1372.35,-1736.96) 1(-1372.35,-1736.96) 1(-1372.35,-1736.94) 1(-1372.35,-1736.94) 1(-1372.35,-1737.04) 1(-1372.35,-1737.04) 1(-1372.35,-1736.96) 1(-1372.35,-1736.96) 1(-1372.35,-1737.28) 1(-1372.35,-1737.28) 1(-1372.35,-1736.88) 1(-1372.35,-1736.88) 1(-1372.34,-1737.03) 1(-1372.34,-1737.03) 1(-1372.34,-1737) 1(-1372.34,-1737) 1(-1372.34,-1736.92) 1(-1372.34,-1736.92) 1(-1372.34,-1737.03) 1(-1372.34,-1737.03) 1(-1372.34,-1736.94) 1(-1372.34,-1736.94) 1(-1372.34,-1737) 1(-1372.34,-1737) 1(-1372.34,-1737.01) 1(-1372.34,-1737.01) 1(-1372.34,-1737.23) 1(-1372.34,-1737.23) 1(-1372.34,-1737) 1(-1372.34,-1737) 1(-1372.34,-1736.97) 1(-1372.34,-1736.97) 1(-1372.34,-1737.04) 1(-1372.34,-1737.04) 1(-1372.34,-1736.94) 1(-1372.34,-1736.94) 1(-1372.34,-1736.99) 1(-1372.34,-1736.99) 1(-1372.34,-1736.92) 1(-1372.34,-1736.92) 1(-1372.34,-1736.88) 1(-1372.34,-1736.88) 1(-1372.34,-1737.07) 1(-1372.34,-1737.07) 1(-1372.34,-1736.87) 1(-1372.34,-1736.87) 1(-1372.34,-1737) 1(-1372.34,-1737) 1(-1372.34,-1737) 1(-1372.34,-1737) 1(-1372.34,-1736.99) 1(-1372.34,-1736.99) 1(-1372.34,-1736.99) 1(-1372.34,-1736.99) 1(-1372.34,-1737.03) 1(-1372.34,-1737.03) 1(-1372.34,-1737.04) 1(-1372.34,-1737.04) 1(-1372.34,-1736.96) 1(-1372.34,-1736.96) 1(-1372.34,-1736.96) 1(-1372.34,-1736.96) 1(-1372.34,-1736.98) 1(-1372.34,-1736.98) 1(-1372.34,-1736.86) 1(-1372.34,-1736.86) 1(-1372.34,-1737.04) 1(-1372.34,-1737.04) 1(-1372.34,-1737.02) 1(-1372.34,-1737.02) 1(-1372.34,-1736.96) 1(-1372.34,-1736.96) 1(-1372.34,-1737.04) 1(-1372.34,-1737.04) 1(-1372.34,-1736.96) 1(-1372.34,-1736.96) 1(-1372.34,-1736.88) 1(-1372.34,-1736.88) 1(-1372.34,-1736.92) 1(-1372.34,-1736.92) 1(-1372.34,-1736.99) 1(-1372.34,-1736.99) 1(-1372.34,-1736.95) 1(-1372.34,-1736.95) 1(-1372.34,-1736.95) 1(-1372.34,-1736.95) 1(-1372.34,-1737.23) 1(-1372.34,-1737.23) 1(-1372.34,-1736.86) 1(-1372.34,-1736.86) 1(-1372.34,-1737.04) 1(-1372.34,-1737.04) 1(-1372.34,-1737) 1(-1372.34,-1737) 1(-1372.34,-1737.04) 1(-1372.34,-1737.04) 1(-1372.34,-1736.99) 1(-1372.34,-1736.99) 1(-1372.34,-1737.06) 1(-1372.34,-1737.06) 1(-1372.34,-1736.94) 1(-1372.34,-1736.94) 1(-1372.34,-1737) 1(-1372.34,-1737) 1(-1372.34,-1737.02) 1(-1372.34,-1737.02) 1(-1372.34,-1736.91) 1(-1372.34,-1736.91) 1(-1372.34,-1737.04) 1(-1372.34,-1737.04) 1(-1372.34,-1737.07) 1(-1372.34,-1737.07) 1(-1372.34,-1736.92) 1(-1372.34,-1736.92) 1(-1372.34,-1736.96) 1(-1372.34,-1736.96) 1(-1372.34,-1736.86) 1(-1372.34,-1736.86) 1(-1372.34,-1736.95) 1(-1372.34,-1736.95) 1(-1372.34,-1736.91) 1(-1372.34,-1736.91) 1(-1372.34,-1737) 1(-1372.34,-1737) 1(-1372.34,-1736.98) 1(-1372.34,-1736.98) 1(-1372.34,-1736.96) 1(-1372.34,-1736.96) 1(-1372.34,-1737.04) 1(-1372.34,-1737.04) 1(-1372.34,-1737.04) 1(-1372.34,-1737.04) 1(-1372.34,-1737.02) 1(-1372.34,-1737.02) 1(-1372.34,-1737.02) 1(-1372.34,-1737.02) 1(-1372.34,-1736.95) 1(-1372.34,-1736.95) 1(-1372.34,-1736.97) 1(-1372.34,-1736.97) 1(-1372.34,-1737.03) 1(-1372.34,-1737.03) 1(-1372.34,-1736.91) 1(-1372.34,-1736.91) 1(-1372.34,-1737.03) 1(-1372.34,-1737.03) 1(-1372.34,-1736.92) 1(-1372.34,-1736.92) 1(-1372.34,-1736.88) 1(-1372.34,-1736.88) 1(-1372.34,-1736.95) 1(-1372.34,-1736.95) 1(-1372.34,-1737.22) 1(-1372.34,-1737.22) 1(-1372.34,-1737) 1(-1372.34,-1737) 1(-1372.34,-1736.91) 1(-1372.34,-1736.91) 1(-1372.34,-1737.04) 1(-1372.34,-1737.04) 1(-1372.34,-1736.99) 1(-1372.34,-1736.99) 1(-1372.34,-1736.9) 1(-1372.34,-1736.9) 1(-1372.34,-1736.99) 1(-1372.34,-1736.99) 1(-1372.34,-1736.97) 1(-1372.34,-1736.97) 1(-1372.34,-1737.08) 1(-1372.34,-1737.08) 1(-1372.34,-1736.95) 1(-1372.34,-1736.95) 1(-1372.34,-1736.91) 1(-1372.34,-1736.91) 1(-1372.34,-1736.97) 1(-1372.34,-1736.97) 1(-1372.33,-1737.03) 1(-1372.33,-1737.03) 1(-1372.33,-1736.9) 1(-1372.33,-1736.9) 1(-1372.33,-1736.87) 1(-1372.33,-1736.87) 1(-1372.33,-1737.02) 1(-1372.33,-1737.02) 1(-1372.33,-1736.92) 1(-1372.33,-1736.92) 1(-1372.33,-1737.29) 1(-1372.33,-1737.29) 1(-1372.33,-1737.06) 1(-1372.33,-1737.06) 1(-1372.33,-1737.06) 1(-1372.33,-1737.06) 1(-1372.33,-1737.02) 1(-1372.33,-1737.02) 1(-1372.33,-1736.95) 1(-1372.33,-1736.95) 1(-1372.33,-1736.97) 1(-1372.33,-1736.97) 1(-1372.33,-1737.26) 1(-1372.33,-1737.26) 1(-1372.33,-1736.96) 1(-1372.33,-1736.96) 1(-1372.33,-1736.87) 1(-1372.33,-1736.87) 1(-1372.33,-1737.09) 1(-1372.33,-1737.09) 1(-1372.33,-1737.06) 1(-1372.33,-1737.06) 1(-1372.33,-1736.92) 1(-1372.33,-1736.92) 1(-1372.33,-1736.86) 1(-1372.33,-1736.86) 1(-1372.33,-1737.03) 1(-1372.33,-1737.03) 1(-1372.33,-1736.95) 1(-1372.33,-1736.95) 1(-1372.33,-1736.87) 1(-1372.33,-1736.87) 1(-1372.33,-1737.01) 1(-1372.33,-1737.01) 1(-1372.33,-1737.08) 1(-1372.33,-1737.08) 1(-1372.33,-1737.06) 1(-1372.33,-1737.06) 1(-1372.33,-1736.96) 1(-1372.33,-1736.96) 1(-1372.33,-1736.87) 1(-1372.33,-1736.87) 1(-1372.33,-1736.87) 1(-1372.33,-1736.87) 1(-1372.33,-1737.07) 1(-1372.33,-1737.07) 1(-1372.33,-1736.91) 1(-1372.33,-1736.91) 1(-1372.33,-1737.08) 1(-1372.33,-1737.08) 1(-1372.33,-1737.07) 1(-1372.33,-1737.07) 1(-1372.33,-1736.86) 1(-1372.33,-1736.86) 1(-1372.33,-1737.04) 1(-1372.33,-1737.04) 1(-1372.33,-1737.06) 1(-1372.33,-1737.06) 1(-1372.33,-1737.01) 1(-1372.33,-1737.01) 1(-1372.33,-1737.19) 1(-1372.33,-1737.19) 1(-1372.33,-1737.09) 1(-1372.33,-1737.09) 1(-1372.33,-1736.91) 1(-1372.33,-1736.91) 1(-1372.33,-1737.19) 1(-1372.33,-1737.19) 1(-1372.33,-1737.07) 1(-1372.33,-1737.07) 1(-1372.33,-1737.09) 1(-1372.33,-1737.09) 1(-1372.33,-1737.04) 1(-1372.33,-1737.04) 1(-1372.33,-1737.02) 1(-1372.33,-1737.02) 1(-1372.33,-1737) 1(-1372.33,-1737) 1(-1372.33,-1737.22) 1(-1372.33,-1737.22) 1(-1372.33,-1737.19) 1(-1372.33,-1737.19) 1(-1372.33,-1737.09) 1(-1372.33,-1737.09) 1(-1372.33,-1737) 1(-1372.33,-1737) 1(-1372.33,-1736.99) 1(-1372.33,-1736.99) 1(-1372.33,-1737.03) 1(-1372.33,-1737.03) 1(-1372.33,-1737.09) 1(-1372.33,-1737.09) 1(-1372.33,-1737.03) 1(-1372.33,-1737.03) 1(-1372.33,-1737.08) 1(-1372.33,-1737.08) 1(-1372.33,-1737.04) 1(-1372.33,-1737.04) 1(-1372.33,-1737) 1(-1372.33,-1737) 1(-1372.33,-1736.97) 1(-1372.33,-1736.97) 1(-1372.33,-1736.86) 1(-1372.33,-1736.86) 1(-1372.33,-1737.09) 1(-1372.33,-1737.09) 1(-1372.33,-1737) 1(-1372.33,-1737) 1(-1372.33,-1736.98) 1(-1372.33,-1736.98) 1(-1372.33,-1736.93) 1(-1372.33,-1736.93) 1(-1372.33,-1737.02) 1(-1372.33,-1737.02) 1(-1372.33,-1736.87) 1(-1372.33,-1736.87) 1(-1372.33,-1737.03) 1(-1372.33,-1737.03) 1(-1372.33,-1736.98) 1(-1372.33,-1736.98) 1(-1372.33,-1736.93) 1(-1372.33,-1736.93) 1(-1372.33,-1737.14) 1(-1372.33,-1737.14) 1(-1372.33,-1737.2) 1(-1372.33,-1737.2) 1(-1372.33,-1737.03) 1(-1372.33,-1737.03) 1(-1372.33,-1737) 1(-1372.33,-1737) 1(-1372.33,-1736.86) 1(-1372.33,-1736.86) 1(-1372.33,-1737.22) 1(-1372.33,-1737.22) 1(-1372.33,-1737.1) 1(-1372.33,-1737.1) 1(-1372.33,-1736.91) 1(-1372.33,-1736.91) 1(-1372.33,-1736.87) 1(-1372.33,-1736.87) 1(-1372.33,-1736.96) 1(-1372.33,-1736.96) 1(-1372.33,-1737.09) 1(-1372.33,-1737.09) 1(-1372.33,-1737.2) 1(-1372.33,-1737.2) 1(-1372.33,-1737.09) 1(-1372.33,-1737.09) 1(-1372.33,-1736.98) 1(-1372.33,-1736.98) 1(-1372.33,-1737.21) 1(-1372.33,-1737.21) 1(-1372.33,-1736.95) 1(-1372.33,-1736.95) 1(-1372.33,-1736.95) 1(-1372.33,-1736.95) 1(-1372.33,-1737.2) 1(-1372.33,-1737.2) 1(-1372.33,-1737.19) 1(-1372.33,-1737.19) 1(-1372.33,-1737.19) 1(-1372.33,-1737.19) 1(-1372.33,-1736.96) 1(-1372.33,-1736.96) 1(-1372.33,-1736.86) 1(-1372.33,-1736.86) 1(-1372.33,-1737.21) 1(-1372.33,-1737.21) 1(-1372.33,-1737.23) 1(-1372.33,-1737.23) 1(-1372.33,-1737.2) 1(-1372.33,-1737.2) 1(-1372.33,-1736.94) 1(-1372.33,-1736.94) 1(-1372.33,-1736.87) 1(-1372.33,-1736.87) 1(-1372.32,-1737.09) 1(-1372.32,-1737.09) 1(-1372.32,-1737) 1(-1372.32,-1737) 1(-1372.32,-1737.14) 1(-1372.32,-1737.14) 1(-1372.32,-1737.08) 1(-1372.32,-1737.08) 1(-1372.32,-1737.22) 1(-1372.32,-1737.22) 1(-1372.32,-1737.09) 1(-1372.32,-1737.09) 1(-1372.32,-1737.13) 1(-1372.32,-1737.13) 1(-1372.32,-1737.21) 1(-1372.32,-1737.21) 1(-1372.32,-1736.86) 1(-1372.32,-1736.86) 1(-1372.32,-1737.19) 1(-1372.32,-1737.19) 1(-1372.32,-1737.21) 1(-1372.32,-1737.21) 1(-1372.32,-1737.03) 1(-1372.32,-1737.03) 1(-1372.32,-1737.05) 1(-1372.32,-1737.05) 1(-1372.32,-1737.22) 1(-1372.32,-1737.22) 1(-1372.32,-1736.87) 1(-1372.32,-1736.87) 1(-1372.32,-1737.23) 1(-1372.32,-1737.23) 1(-1372.32,-1737.27) 1(-1372.32,-1737.27) 1(-1372.32,-1737.27) 1(-1372.32,-1737.27) 1(-1372.32,-1737.02) 1(-1372.32,-1737.02) 1(-1372.32,-1737) 1(-1372.32,-1737) 1(-1372.32,-1736.96) 1(-1372.32,-1736.96) 1(-1372.32,-1736.87) 1(-1372.32,-1736.87) 1(-1372.32,-1737.1) 1(-1372.32,-1737.1) 1(-1372.32,-1736.87) 1(-1372.32,-1736.87) 1(-1372.32,-1737.11) 1(-1372.32,-1737.11) 1(-1372.32,-1736.91) 1(-1372.32,-1736.91) 1(-1372.32,-1736.94) 1(-1372.32,-1736.94) 1(-1372.32,-1737.23) 1(-1372.32,-1737.23) 1(-1372.32,-1736.85) 1(-1372.32,-1736.85) 1(-1372.32,-1737.27) 1(-1372.32,-1737.27) 1(-1372.32,-1737.14) 1(-1372.32,-1737.14) 1(-1372.32,-1737.05) 1(-1372.32,-1737.05) 1(-1372.32,-1737.03) 1(-1372.32,-1737.03) 1(-1372.32,-1736.95) 1(-1372.32,-1736.95) 1(-1372.32,-1737.04) 1(-1372.32,-1737.04) 1(-1372.32,-1737.12) 1(-1372.32,-1737.12) 1(-1372.32,-1737.13) 1(-1372.32,-1737.13) 1(-1372.32,-1737.28) 1(-1372.32,-1737.28) 1(-1372.32,-1737.23) 1(-1372.32,-1737.23) 1(-1372.32,-1737.12) 1(-1372.32,-1737.12) 1(-1372.32,-1737) 1(-1372.32,-1737) 1(-1372.32,-1736.85) 1(-1372.32,-1736.85) 1(-1372.32,-1736.87) 1(-1372.32,-1736.87) 1(-1372.32,-1736.95) 1(-1372.32,-1736.95) 1(-1372.32,-1736.87) 1(-1372.32,-1736.87) 1(-1372.32,-1737.09) 1(-1372.32,-1737.09) 1(-1372.32,-1737.23) 1(-1372.32,-1737.23) 1(-1372.32,-1736.97) 1(-1372.32,-1736.97) 1(-1372.32,-1737.19) 1(-1372.32,-1737.19) 1(-1372.32,-1737.05) 1(-1372.32,-1737.05) 1(-1372.32,-1737.05) 1(-1372.32,-1737.05) 1(-1372.32,-1737.11) 1(-1372.32,-1737.11) 1(-1372.32,-1736.85) 1(-1372.32,-1736.85) 1(-1372.32,-1736.99) 1(-1372.32,-1736.99) 1(-1372.32,-1736.98) 1(-1372.32,-1736.98) 1(-1372.32,-1736.87) 1(-1372.32,-1736.87) 1(-1372.32,-1737.18) 1(-1372.32,-1737.18) 1(-1372.32,-1737.09) 1(-1372.32,-1737.09) 1(-1372.32,-1737.14) 1(-1372.32,-1737.14) 1(-1372.32,-1737.07) 1(-1372.32,-1737.07) 1(-1372.32,-1736.85) 1(-1372.32,-1736.85) 1(-1372.32,-1737.12) 1(-1372.32,-1737.12) 1(-1372.32,-1736.87) 1(-1372.32,-1736.87) 1(-1372.32,-1737) 1(-1372.32,-1737) 1(-1372.32,-1737.23) 1(-1372.32,-1737.23) 1(-1372.32,-1736.99) 1(-1372.32,-1736.99) 1(-1372.32,-1737.12) 1(-1372.32,-1737.12) 1(-1372.32,-1736.85) 1(-1372.32,-1736.85) 1(-1372.32,-1737.05) 1(-1372.32,-1737.05) 1(-1372.32,-1737) 1(-1372.32,-1737) 1(-1372.32,-1736.97) 1(-1372.32,-1736.97) 1(-1372.32,-1737.27) 1(-1372.32,-1737.27) 1(-1372.32,-1736.95) 1(-1372.32,-1736.95) 1(-1372.32,-1736.94) 1(-1372.32,-1736.94) 1(-1372.32,-1737.03) 1(-1372.32,-1737.03) 1(-1372.32,-1737.04) 1(-1372.32,-1737.04) 1(-1372.32,-1736.86) 1(-1372.32,-1736.86) 1(-1372.31,-1737.3) 1(-1372.31,-1737.3) 1(-1372.31,-1737.05) 1(-1372.31,-1737.05) 1(-1372.31,-1737.28) 1(-1372.31,-1737.28) 1(-1372.31,-1736.85) 1(-1372.31,-1736.85) 1(-1372.31,-1736.91) 1(-1372.31,-1736.91) 1(-1372.31,-1737.09) 1(-1372.31,-1737.09) 1(-1372.31,-1737.14) 1(-1372.31,-1737.14) 1(-1372.31,-1737.23) 1(-1372.31,-1737.23) 1(-1372.31,-1737.08) 1(-1372.31,-1737.08) 1(-1372.31,-1737.04) 1(-1372.31,-1737.04) 1(-1372.31,-1736.87) 1(-1372.31,-1736.87) 1(-1372.31,-1736.87) 1(-1372.31,-1736.87) 1(-1372.31,-1736.86) 1(-1372.31,-1736.86) 1(-1372.31,-1737.29) 1(-1372.31,-1737.29) 1(-1372.31,-1736.91) 1(-1372.31,-1736.91) 1(-1372.31,-1737.14) 1(-1372.31,-1737.14) 1(-1372.31,-1736.95) 1(-1372.31,-1736.95) 1(-1372.31,-1736.86) 1(-1372.31,-1736.86) 1(-1372.31,-1736.86) 1(-1372.31,-1736.86) 1(-1372.31,-1737.06) 1(-1372.31,-1737.06) 1(-1372.31,-1737.18) 1(-1372.31,-1737.18) 1(-1372.31,-1737) 1(-1372.31,-1737) 1(-1372.31,-1737) 1(-1372.31,-1737) 1(-1372.31,-1736.96) 1(-1372.31,-1736.96) 1(-1372.31,-1736.85) 1(-1372.31,-1736.85) 1(-1372.31,-1737.29) 1(-1372.31,-1737.29) 1(-1372.31,-1737.29) 1(-1372.31,-1737.29) 1(-1372.31,-1737.18) 1(-1372.31,-1737.18) 1(-1372.31,-1737.05) 1(-1372.31,-1737.05) 1(-1372.31,-1736.96) 1(-1372.31,-1736.96) 1(-1372.31,-1737.09) 1(-1372.31,-1737.09) 1(-1372.31,-1736.86) 1(-1372.31,-1736.86) 1(-1372.31,-1737) 1(-1372.31,-1737) 1(-1372.31,-1737) 1(-1372.31,-1737) 1(-1372.31,-1737.27) 1(-1372.31,-1737.27) 1(-1372.31,-1737.09) 1(-1372.31,-1737.09) 1(-1372.31,-1736.86) 1(-1372.31,-1736.86) 1(-1372.31,-1737.07) 1(-1372.31,-1737.07) 1(-1372.31,-1736.86) 1(-1372.31,-1736.86) 1(-1372.31,-1736.98) 1(-1372.31,-1736.98) 1(-1372.31,-1737.01) 1(-1372.31,-1737.01) 1(-1372.31,-1737.03) 1(-1372.31,-1737.03) 1(-1372.31,-1736.92) 1(-1372.31,-1736.92) 1(-1372.31,-1736.93) 1(-1372.31,-1736.93) 1(-1372.31,-1737.29) 1(-1372.31,-1737.29) 1(-1372.31,-1737.29) 1(-1372.31,-1737.29) 1(-1372.31,-1737.15) 1(-1372.31,-1737.15) 1(-1372.31,-1737.23) 1(-1372.31,-1737.23) 1(-1372.31,-1737.01) 1(-1372.31,-1737.01) 1(-1372.31,-1737.28) 1(-1372.31,-1737.28) 1(-1372.31,-1737.24) 1(-1372.31,-1737.24) 1(-1372.31,-1737.15) 1(-1372.31,-1737.15) 1(-1372.31,-1737.09) 1(-1372.31,-1737.09) 1(-1372.31,-1737.06) 1(-1372.31,-1737.06) 1(-1372.31,-1736.85) 1(-1372.31,-1736.85) 1(-1372.31,-1737.05) 1(-1372.31,-1737.05) 1(-1372.31,-1737.03) 1(-1372.31,-1737.03) 1(-1372.31,-1737.17) 1(-1372.31,-1737.17) 1(-1372.31,-1736.94) 1(-1372.31,-1736.94) 1(-1372.31,-1737.28) 1(-1372.31,-1737.28) 1(-1372.31,-1737.28) 1(-1372.31,-1737.28) 1(-1372.31,-1736.96) 1(-1372.31,-1736.96) 1(-1372.31,-1737.03) 1(-1372.31,-1737.03) 1(-1372.31,-1737.09) 1(-1372.31,-1737.09) 1(-1372.31,-1737.01) 1(-1372.31,-1737.01) 1(-1372.31,-1737.17) 1(-1372.31,-1737.17) 1(-1372.3,-1736.99) 1(-1372.3,-1736.99) 1(-1372.3,-1737.16) 1(-1372.3,-1737.16) 1(-1372.3,-1737.06) 1(-1372.3,-1737.06) 1(-1372.3,-1737.05) 1(-1372.3,-1737.05) 1(-1372.3,-1737.07) 1(-1372.3,-1737.07) 1(-1372.3,-1737.05) 1(-1372.3,-1737.05) 1(-1372.3,-1737.02) 1(-1372.3,-1737.02) 1(-1372.3,-1737.16) 1(-1372.3,-1737.16) 1(-1372.3,-1737.03) 1(-1372.3,-1737.03) 1(-1372.3,-1737.03) 1(-1372.3,-1737.03) 1(-1372.3,-1737.06) 1(-1372.3,-1737.06) 1(-1372.3,-1737.05) 1(-1372.3,-1737.05) 1(-1372.3,-1737.15) 1(-1372.3,-1737.15) 1(-1372.3,-1737.01) 1(-1372.3,-1737.01) 1(-1372.3,-1737.29) 1(-1372.3,-1737.29) 1(-1372.3,-1737.09) 1(-1372.3,-1737.09) 1(-1372.3,-1737.03) 1(-1372.3,-1737.03) 1(-1372.3,-1737) 1(-1372.3,-1737) 1(-1372.3,-1736.98) 1(-1372.3,-1736.98) 1(-1372.3,-1736.97) 1(-1372.3,-1736.97) 1(-1372.3,-1736.85) 1(-1372.3,-1736.85) 1(-1372.3,-1736.9) 1(-1372.3,-1736.9) 1(-1372.3,-1737.24) 1(-1372.3,-1737.24) 1(-1372.3,-1736.95) 1(-1372.3,-1736.95) 1(-1372.3,-1736.98) 1(-1372.3,-1736.98) 1(-1372.3,-1737.06) 1(-1372.3,-1737.06) 1(-1372.3,-1737.02) 1(-1372.3,-1737.02) 1(-1372.3,-1737.16) 1(-1372.3,-1737.16) 1(-1372.3,-1737.16) 1(-1372.3,-1737.16) 1(-1372.3,-1737.02) 1(-1372.3,-1737.02) 1(-1372.3,-1736.99) 1(-1372.3,-1736.99) 1(-1372.3,-1737.06) 1(-1372.3,-1737.06) 1(-1372.3,-1736.98) 1(-1372.3,-1736.98) 1(-1372.3,-1736.98) 1(-1372.3,-1736.98) 1(-1372.3,-1736.97) 1(-1372.3,-1736.97) 1(-1372.3,-1737.02) 1(-1372.3,-1737.02) 1(-1372.3,-1736.96) 1(-1372.3,-1736.96) 1(-1372.3,-1736.94) 1(-1372.3,-1736.94) 1(-1372.3,-1737.03) 1(-1372.3,-1737.03) 1(-1372.3,-1736.86) 1(-1372.3,-1736.86) 1(-1372.3,-1736.86) 1(-1372.3,-1736.86) 1(-1372.3,-1737.03) 1(-1372.3,-1737.03) 1(-1372.3,-1737.24) 1(-1372.3,-1737.24) 1(-1372.3,-1737.05) 1(-1372.3,-1737.05) 1(-1372.3,-1736.95) 1(-1372.3,-1736.95) 1(-1372.3,-1737.08) 1(-1372.3,-1737.08) 1(-1372.3,-1736.85) 1(-1372.3,-1736.85) 1(-1372.3,-1736.95) 1(-1372.3,-1736.95) 1(-1372.3,-1736.99) 1(-1372.3,-1736.99) 1(-1372.3,-1736.94) 1(-1372.3,-1736.94) 1(-1372.3,-1736.86) 1(-1372.3,-1736.86) 1(-1372.3,-1737.09) 1(-1372.3,-1737.09) 1(-1372.3,-1737.05) 1(-1372.3,-1737.05) 1(-1372.3,-1737.24) 1(-1372.3,-1737.24) 1(-1372.3,-1736.95) 1(-1372.3,-1736.95) 1(-1372.3,-1736.98) 1(-1372.3,-1736.98) 1(-1372.3,-1736.95) 1(-1372.3,-1736.95) 1(-1372.3,-1736.94) 1(-1372.3,-1736.94) 1(-1372.3,-1736.86) 1(-1372.3,-1736.86) 1(-1372.3,-1737.05) 1(-1372.3,-1737.05) 1(-1372.3,-1737.02) 1(-1372.3,-1737.02) 1(-1372.3,-1736.86) 1(-1372.3,-1736.86) 1(-1372.3,-1737.24) 1(-1372.3,-1737.24) 1(-1372.3,-1737.23) 1(-1372.3,-1737.23) 1(-1372.3,-1737.04) 1(-1372.3,-1737.04) 1(-1372.3,-1736.85) 1(-1372.3,-1736.85) 1(-1372.3,-1736.9) 1(-1372.3,-1736.9) 1(-1372.3,-1736.98) 1(-1372.3,-1736.98) 1(-1372.3,-1737.06) 1(-1372.3,-1737.06) 1(-1372.3,-1737.09) 1(-1372.3,-1737.09) 1(-1372.3,-1737.26) 1(-1372.3,-1737.26) 1(-1372.3,-1737.26) 1(-1372.3,-1737.26) 1(-1372.3,-1737.08) 1(-1372.3,-1737.08) 1(-1372.3,-1737.06) 1(-1372.3,-1737.06) 1(-1372.3,-1736.94) 1(-1372.3,-1736.94) 1(-1372.3,-1737.01) 1(-1372.3,-1737.01) 1(-1372.3,-1737.03) 1(-1372.3,-1737.03) 1(-1372.3,-1737.24) 1(-1372.3,-1737.24) 1(-1372.3,-1736.95) 1(-1372.3,-1736.95) 1(-1372.3,-1736.94) 1(-1372.3,-1736.94) 1(-1372.3,-1736.97) 1(-1372.3,-1736.97) 1(-1372.3,-1736.91) 1(-1372.3,-1736.91) 1(-1372.3,-1736.9) 1(-1372.3,-1736.9) 1(-1372.3,-1737.24) 1(-1372.3,-1737.24) 1(-1372.3,-1736.84) 1(-1372.3,-1736.84) 1(-1372.3,-1736.92) 1(-1372.3,-1736.92) 1(-1372.3,-1737.02) 1(-1372.3,-1737.02) 1(-1372.3,-1737.03) 1(-1372.3,-1737.03) 1(-1372.3,-1736.95) 1(-1372.3,-1736.95) 1(-1372.3,-1736.93) 1(-1372.3,-1736.93) 1(-1372.3,-1737.25) 1(-1372.3,-1737.25) 1(-1372.3,-1736.9) 1(-1372.3,-1736.9) 1(-1372.3,-1737.08) 1(-1372.3,-1737.08) 1(-1372.3,-1737.02) 1(-1372.3,-1737.02) 1(-1372.3,-1737.06) 1(-1372.3,-1737.06) 1(-1372.3,-1736.97) 1(-1372.3,-1736.97) 1(-1372.3,-1737.09) 1(-1372.3,-1737.09) 1(-1372.3,-1737.26) 1(-1372.3,-1737.26) 1(-1372.3,-1736.89) 1(-1372.3,-1736.89) 1(-1372.3,-1737.05) 1(-1372.3,-1737.05) 1(-1372.3,-1737) 1(-1372.3,-1737) 1(-1372.3,-1736.99) 1(-1372.3,-1736.99) 1(-1372.3,-1736.95) 1(-1372.3,-1736.95) 1(-1372.3,-1736.93) 1(-1372.3,-1736.93) 1(-1372.29,-1737.06) 1(-1372.29,-1737.06) 1(-1372.29,-1736.98) 1(-1372.29,-1736.98) 1(-1372.29,-1736.98) 1(-1372.29,-1736.98) 1(-1372.29,-1736.9) 1(-1372.29,-1736.9) 1(-1372.29,-1737.26) 1(-1372.29,-1737.26) 1(-1372.29,-1737.08) 1(-1372.29,-1737.08) 1(-1372.29,-1737.05) 1(-1372.29,-1737.05) 1(-1372.29,-1736.89) 1(-1372.29,-1736.89) 1(-1372.29,-1736.95) 1(-1372.29,-1736.95) 1(-1372.29,-1736.93) 1(-1372.29,-1736.93) 1(-1372.29,-1737.29) 1(-1372.29,-1737.29) 1(-1372.29,-1736.95) 1(-1372.29,-1736.95) 1(-1372.29,-1736.94) 1(-1372.29,-1736.94) 1(-1372.29,-1736.9) 1(-1372.29,-1736.9) 1(-1372.29,-1736.86) 1(-1372.29,-1736.86) 1(-1372.29,-1736.84) 1(-1372.29,-1736.84) 1(-1372.29,-1736.96) 1(-1372.29,-1736.96) 1(-1372.29,-1737.07) 1(-1372.29,-1737.07) 1(-1372.29,-1737.06) 1(-1372.29,-1737.06) 1(-1372.29,-1736.94) 1(-1372.29,-1736.94) 1(-1372.29,-1737.09) 1(-1372.29,-1737.09) 1(-1372.29,-1737.06) 1(-1372.29,-1737.06) 1(-1372.29,-1737.07) 1(-1372.29,-1737.07) 1(-1372.29,-1737.05) 1(-1372.29,-1737.05) 1(-1372.29,-1736.89) 1(-1372.29,-1736.89) 1(-1372.29,-1736.89) 1(-1372.29,-1736.89) 1(-1372.29,-1737.07) 1(-1372.29,-1737.07) 1(-1372.29,-1737.26) 1(-1372.29,-1737.26) 1(-1372.29,-1736.96) 1(-1372.29,-1736.96) 1(-1372.29,-1737.09) 1(-1372.29,-1737.09) 1(-1372.29,-1737) 1(-1372.29,-1737) 1(-1372.29,-1737) 1(-1372.29,-1737) 1(-1372.29,-1736.93) 1(-1372.29,-1736.93) 1(-1372.29,-1737.06) 1(-1372.29,-1737.06) 1(-1372.29,-1737.08) 1(-1372.29,-1737.08) 1(-1372.29,-1737) 1(-1372.29,-1737) 1(-1372.29,-1737.24) 1(-1372.29,-1737.24) 1(-1372.29,-1737.03) 1(-1372.29,-1737.03) 1(-1372.29,-1737.03) 1(-1372.29,-1737.03) 1(-1372.29,-1737.02) 1(-1372.29,-1737.02) 1(-1372.29,-1736.86) 1(-1372.29,-1736.86) 1(-1372.29,-1737.01) 1(-1372.29,-1737.01) 1(-1372.29,-1736.9) 1(-1372.29,-1736.9) 1(-1372.29,-1737.08) 1(-1372.29,-1737.08) 1(-1372.29,-1737.02) 1(-1372.29,-1737.02) 1(-1372.29,-1736.97) 1(-1372.29,-1736.97) 1(-1372.29,-1737.07) 1(-1372.29,-1737.07) 1(-1372.29,-1737.05) 1(-1372.29,-1737.05) 1(-1372.29,-1736.9) 1(-1372.29,-1736.9) 1(-1372.29,-1737.24) 1(-1372.29,-1737.24) 1(-1372.29,-1737.03) 1(-1372.29,-1737.03) 1(-1372.29,-1737.26) 1(-1372.29,-1737.26) 1(-1372.29,-1737.24) 1(-1372.29,-1737.24) 1(-1372.29,-1737.08) 1(-1372.29,-1737.08) 1(-1372.29,-1737.26) 1(-1372.29,-1737.26) 1(-1372.29,-1737.02) 1(-1372.29,-1737.02) 1(-1372.29,-1737.01) 1(-1372.29,-1737.01) 1(-1372.29,-1736.98) 1(-1372.29,-1736.98) 1(-1372.29,-1736.98) 1(-1372.29,-1736.98) 1(-1372.29,-1736.9) 1(-1372.29,-1736.9) 1(-1372.29,-1736.99) 1(-1372.29,-1736.99) 1(-1372.29,-1736.97) 1(-1372.29,-1736.97) 1(-1372.29,-1737.09) 1(-1372.29,-1737.09) 1(-1372.29,-1736.99) 1(-1372.29,-1736.99) 1(-1372.29,-1736.85) 1(-1372.29,-1736.85) 1(-1372.29,-1736.9) 1(-1372.29,-1736.9) 1(-1372.29,-1737.26) 1(-1372.29,-1737.26) 1(-1372.29,-1736.84) 1(-1372.29,-1736.84) 1(-1372.29,-1737.25) 1(-1372.29,-1737.25) 1(-1372.29,-1737.14) 1(-1372.29,-1737.14) 1(-1372.29,-1736.96) 1(-1372.29,-1736.96) 1(-1372.29,-1737.09) 1(-1372.29,-1737.09) 1(-1372.29,-1736.99) 1(-1372.29,-1736.99) 1(-1372.29,-1736.97) 1(-1372.29,-1736.97) 1(-1372.29,-1737.06) 1(-1372.29,-1737.06) 1(-1372.29,-1737.14) 1(-1372.29,-1737.14) 1(-1372.29,-1736.99) 1(-1372.29,-1736.99) 1(-1372.29,-1737.04) 1(-1372.29,-1737.04) 1(-1372.29,-1737.24) 1(-1372.29,-1737.24) 1(-1372.29,-1737.14) 1(-1372.29,-1737.14) 1(-1372.29,-1736.95) 1(-1372.29,-1736.95) 1(-1372.29,-1737.08) 1(-1372.29,-1737.08) 1(-1372.29,-1736.94) 1(-1372.29,-1736.94) 1(-1372.29,-1736.94) 1(-1372.29,-1736.94) 1(-1372.29,-1736.95) 1(-1372.29,-1736.95) 1(-1372.29,-1736.9) 1(-1372.29,-1736.9) 1(-1372.29,-1737.26) 1(-1372.29,-1737.26) 1(-1372.29,-1737) 1(-1372.29,-1737) 1(-1372.29,-1736.95) 1(-1372.29,-1736.95) 1(-1372.29,-1737.13) 1(-1372.29,-1737.13) 1(-1372.29,-1736.93) 1(-1372.29,-1736.93) 1(-1372.29,-1736.92) 1(-1372.29,-1736.92) 1(-1372.29,-1736.9) 1(-1372.29,-1736.9) 1(-1372.29,-1737.13) 1(-1372.29,-1737.13) 1(-1372.29,-1737.12) 1(-1372.29,-1737.12) 1(-1372.29,-1736.94) 1(-1372.29,-1736.94) 1(-1372.28,-1736.97) 1(-1372.28,-1736.97) 1(-1372.28,-1737.26) 1(-1372.28,-1737.26) 1(-1372.28,-1736.98) 1(-1372.28,-1736.98) 1(-1372.28,-1737.02) 1(-1372.28,-1737.02) 1(-1372.28,-1736.92) 1(-1372.28,-1736.92) 1(-1372.28,-1736.86) 1(-1372.28,-1736.86) 1(-1372.28,-1736.84) 1(-1372.28,-1736.84) 1(-1372.28,-1736.95) 1(-1372.28,-1736.95) 1(-1372.28,-1737.01) 1(-1372.28,-1737.01) 1(-1372.28,-1736.94) 1(-1372.28,-1736.94) 1(-1372.28,-1737.09) 1(-1372.28,-1737.09) 1(-1372.28,-1737.05) 1(-1372.28,-1737.05) 1(-1372.28,-1736.93) 1(-1372.28,-1736.93) 1(-1372.28,-1736.85) 1(-1372.28,-1736.85) 1(-1372.28,-1736.86) 1(-1372.28,-1736.86) 1(-1372.28,-1737.14) 1(-1372.28,-1737.14) 1(-1372.28,-1737.26) 1(-1372.28,-1737.26) 1(-1372.28,-1736.95) 1(-1372.28,-1736.95) 1(-1372.28,-1737.12) 1(-1372.28,-1737.12) 1(-1372.28,-1737.09) 1(-1372.28,-1737.09) 1(-1372.28,-1736.99) 1(-1372.28,-1736.99) 1(-1372.28,-1736.95) 1(-1372.28,-1736.95) 1(-1372.28,-1737.09) 1(-1372.28,-1737.09) 1(-1372.28,-1737) 1(-1372.28,-1737) 1(-1372.28,-1737.1) 1(-1372.28,-1737.1) 1(-1372.28,-1737.3) 1(-1372.28,-1737.3) 1(-1372.28,-1737.23) 1(-1372.28,-1737.23) 1(-1372.28,-1737.24) 1(-1372.28,-1737.24) 1(-1372.28,-1736.84) 1(-1372.28,-1736.84) 1(-1372.28,-1737) 1(-1372.28,-1737) 1(-1372.28,-1736.97) 1(-1372.28,-1736.97) 1(-1372.28,-1737.26) 1(-1372.28,-1737.26) 1(-1372.28,-1736.93) 1(-1372.28,-1736.93) 1(-1372.28,-1737.06) 1(-1372.28,-1737.06) 1(-1372.28,-1737.06) 1(-1372.28,-1737.06) 1(-1372.28,-1736.93) 1(-1372.28,-1736.93) 1(-1372.28,-1737.14) 1(-1372.28,-1737.14) 1(-1372.28,-1737.11) 1(-1372.28,-1737.11) 1(-1372.28,-1736.9) 1(-1372.28,-1736.9) 1(-1372.28,-1737.1) 1(-1372.28,-1737.1) 1(-1372.28,-1736.86) 1(-1372.28,-1736.86) 1(-1372.28,-1736.92) 1(-1372.28,-1736.92) 1(-1372.28,-1737.11) 1(-1372.28,-1737.11) 1(-1372.28,-1737.08) 1(-1372.28,-1737.08) 1(-1372.28,-1736.94) 1(-1372.28,-1736.94) 1(-1372.28,-1737.13) 1(-1372.28,-1737.13) 1(-1372.28,-1736.86) 1(-1372.28,-1736.86) 1(-1372.28,-1736.86) 1(-1372.28,-1736.86) 1(-1372.28,-1736.85) 1(-1372.28,-1736.85) 1(-1372.28,-1737.08) 1(-1372.28,-1737.08) 1(-1372.28,-1736.85) 1(-1372.28,-1736.85) 1(-1372.28,-1736.84) 1(-1372.28,-1736.84) 1(-1372.28,-1736.85) 1(-1372.28,-1736.85) 1(-1372.28,-1736.85) 1(-1372.28,-1736.85) 1(-1372.28,-1737.12) 1(-1372.28,-1737.12) 1(-1372.28,-1737.11) 1(-1372.28,-1737.11) 1(-1372.28,-1737.1) 1(-1372.28,-1737.1) 1(-1372.28,-1737.26) 1(-1372.28,-1737.26) 1(-1372.28,-1736.99) 1(-1372.28,-1736.99) 1(-1372.28,-1737.11) 1(-1372.28,-1737.11) 1(-1372.28,-1737.07) 1(-1372.28,-1737.07) 1(-1372.28,-1737.01) 1(-1372.28,-1737.01) 1(-1372.28,-1737.13) 1(-1372.28,-1737.13) 1(-1372.28,-1737.07) 1(-1372.28,-1737.07) 1(-1372.28,-1737.11) 1(-1372.28,-1737.11) 1(-1372.28,-1737.11) 1(-1372.28,-1737.11) 1(-1372.28,-1737.1) 1(-1372.28,-1737.1) 1(-1372.28,-1737.12) 1(-1372.28,-1737.12) 1(-1372.27,-1737.14) 1(-1372.27,-1737.14) 1(-1372.27,-1737.02) 1(-1372.27,-1737.02) 1(-1372.27,-1737.03) 1(-1372.27,-1737.03) 1(-1372.27,-1737) 1(-1372.27,-1737) 1(-1372.27,-1736.84) 1(-1372.27,-1736.84) 1(-1372.27,-1737.12) 1(-1372.27,-1737.12) 1(-1372.27,-1737.11) 1(-1372.27,-1737.11) 1(-1372.27,-1737.07) 1(-1372.27,-1737.07) 1(-1372.27,-1737) 1(-1372.27,-1737) 1(-1372.27,-1736.93) 1(-1372.27,-1736.93) 1(-1372.27,-1736.85) 1(-1372.27,-1736.85) 1(-1372.27,-1737.12) 1(-1372.27,-1737.12) 1(-1372.27,-1736.98) 1(-1372.27,-1736.98) 1(-1372.27,-1737.01) 1(-1372.27,-1737.01) 1(-1372.27,-1737.14) 1(-1372.27,-1737.14) 1(-1372.27,-1736.84) 1(-1372.27,-1736.84) 1(-1372.27,-1737.23) 1(-1372.27,-1737.23) 1(-1372.27,-1736.84) 1(-1372.27,-1736.84) 1(-1372.27,-1736.85) 1(-1372.27,-1736.85) 1(-1372.27,-1737.05) 1(-1372.27,-1737.05) 1(-1372.27,-1736.85) 1(-1372.27,-1736.85) 1(-1372.27,-1737.13) 1(-1372.27,-1737.13) 1(-1372.27,-1736.99) 1(-1372.27,-1736.99) 1(-1372.27,-1737.24) 1(-1372.27,-1737.24) 1(-1372.27,-1737.12) 1(-1372.27,-1737.12) 1(-1372.27,-1736.98) 1(-1372.27,-1736.98) 1(-1372.27,-1737.11) 1(-1372.27,-1737.11) 1(-1372.27,-1737.11) 1(-1372.27,-1737.11) 1(-1372.27,-1737) 1(-1372.27,-1737) 1(-1372.27,-1737.1) 1(-1372.27,-1737.1) 1(-1372.27,-1737.08) 1(-1372.27,-1737.08) 1(-1372.27,-1737.08) 1(-1372.27,-1737.08) 1(-1372.27,-1737.12) 1(-1372.27,-1737.12) 1(-1372.27,-1736.84) 1(-1372.27,-1736.84) 1(-1372.27,-1737.12) 1(-1372.27,-1737.12) 1(-1372.27,-1736.85) 1(-1372.27,-1736.85) 1(-1372.27,-1737.11) 1(-1372.27,-1737.11) 1(-1372.27,-1736.96) 1(-1372.27,-1736.96) 1(-1372.27,-1736.83) 1(-1372.27,-1736.83) 1(-1372.27,-1736.85) 1(-1372.27,-1736.85) 1(-1372.27,-1736.89) 1(-1372.27,-1736.89) 1(-1372.27,-1737.24) 1(-1372.27,-1737.24) 1(-1372.27,-1736.85) 1(-1372.27,-1736.85) 1(-1372.27,-1737.13) 1(-1372.27,-1737.13)